# Altium PCB PCB_BrainBoard.PcbDoc (part 2 of 2)
Units mm, origin at the board's own origin, x right, y up, seen from the top; angles counter-clockwise.
Board outline 61.43 x 55.65 mm, 2 copper layers (Top Layer, Bottom Layer); 48 components, 39 nets, 219 pads, 49 vias.
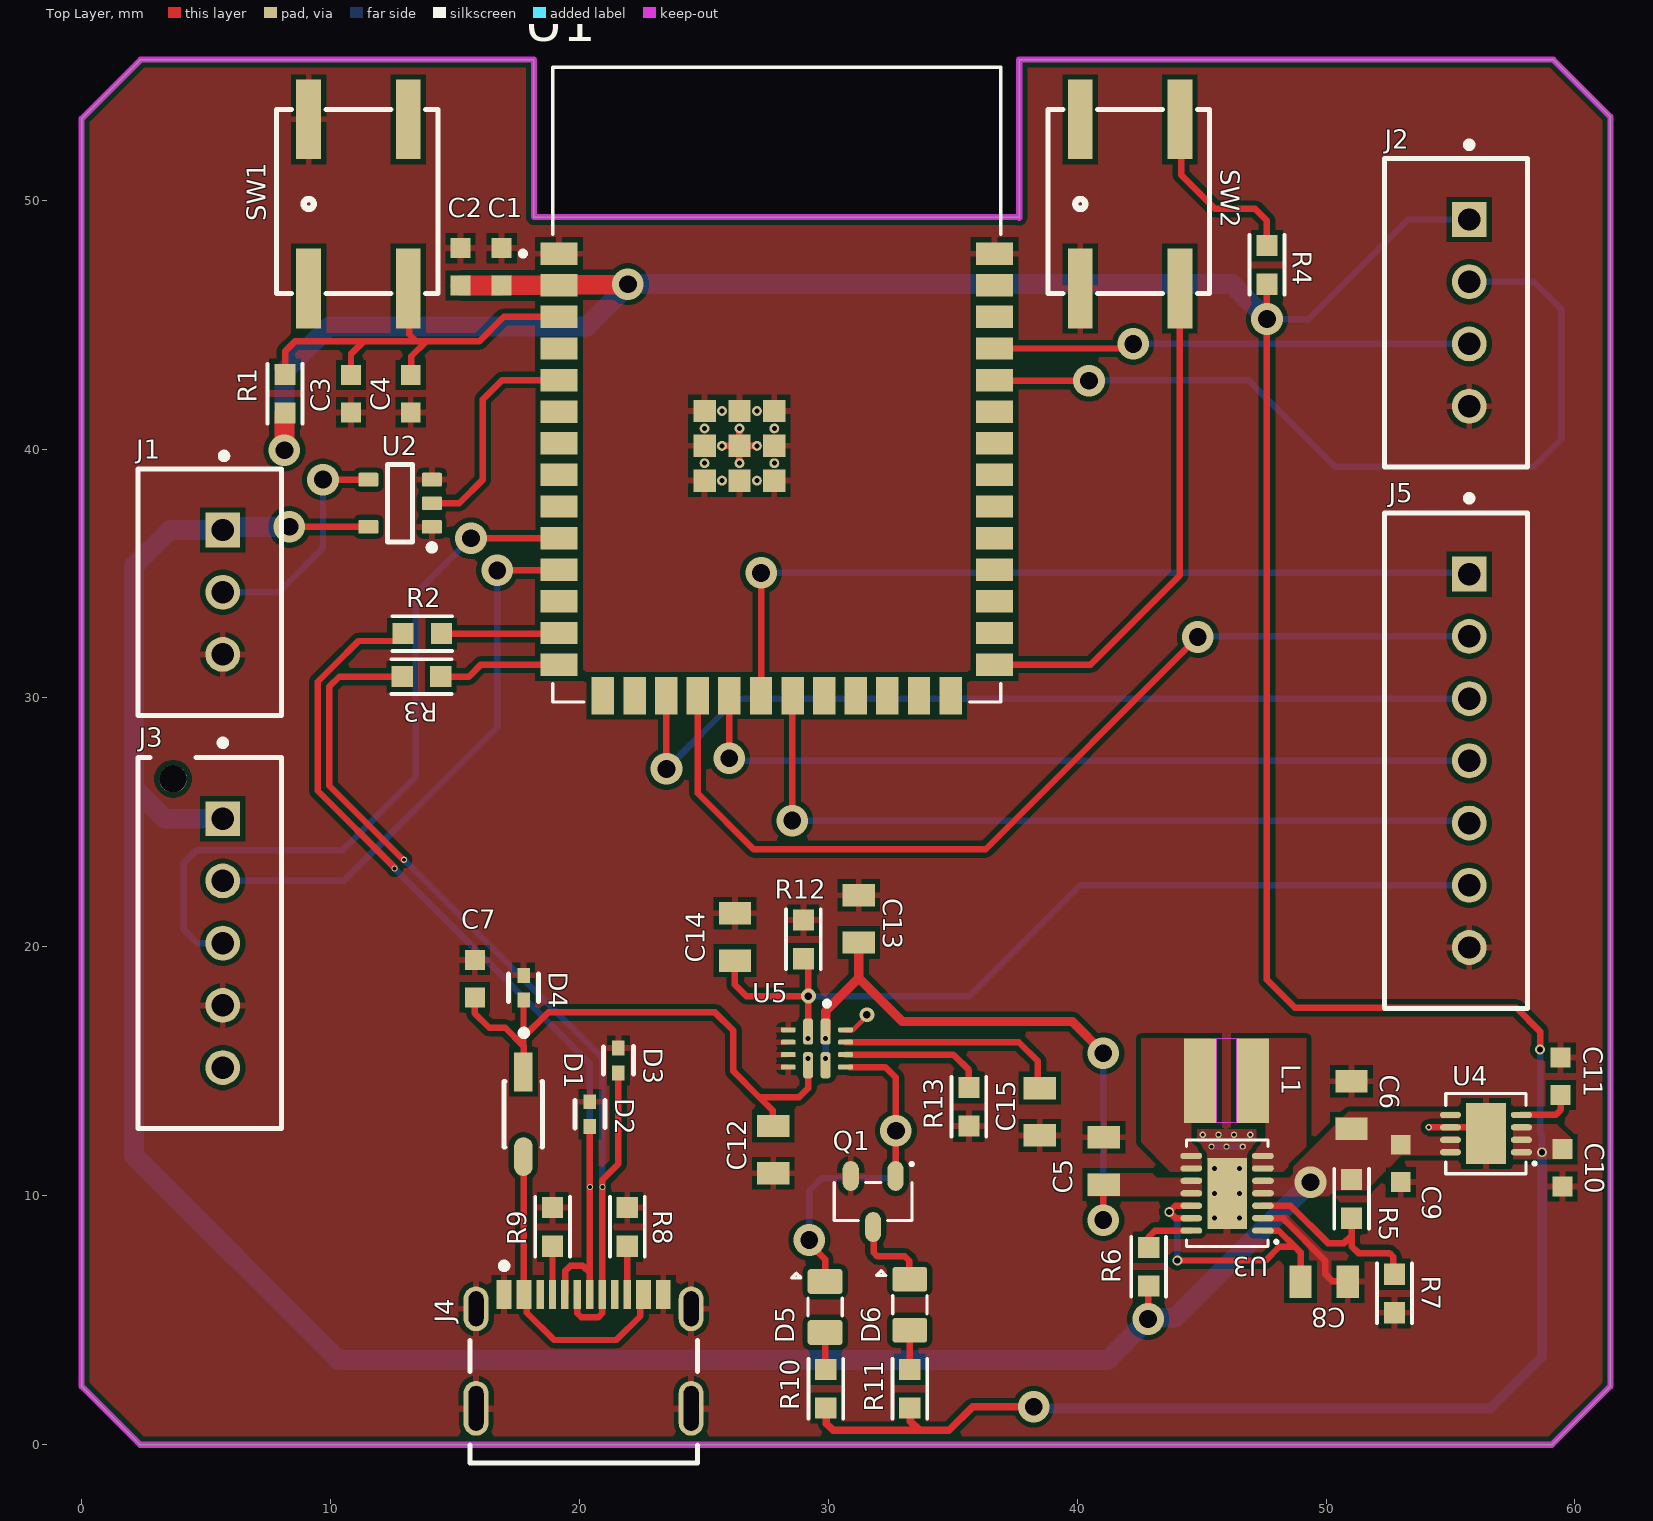
[diagram p0: Top Layer view]

## Part data (continued)
U4: "LDO Regulator Pos 3.3V 2A Medical 8-Pin LFCSP EP T/R", Dropout Voltage=172mV, Manufacturer="Analog Devices", Manufacturer Lifecycle Status=PRODUCTION, Max Junction Temperature (Tj)=125°C, Max Output current=2A, Max Supply Voltage=6.5V, Min Current Limit=2.4A, Min Input Voltage=2.3V, Min Operating Temperature=-40°C, Output Voltage=3.3V, Quiescent Current=700µA, Supplier Part Number=505-ADM7172ACPZ-3.3-R7CT-ND, Accuracy=1.5%, Category="Voltage Regulators - Linear", ComponentLink1Description=https://octopart.com:443/opatz8j6/c1?t=bexnlEUvTW4ypcfmMwlQqMukjbZ1sFR7u3HjvhF_p0I1qGgozQEmLYCO0KwwxyEbZiH-eJUsaq8roSbEQNHeTfmOLjlUalTxX2N5GzImcnPMgEcSznHyXIFAgYBb3OUFi_TCl-xASKxKL_mduVIwpazwMBHKV180gVIIaW80selJWFwC_3dSvsH907UDuDBRMF5w27S6ay03f3bc-2j1dmxAk8VGKHozbFK1-BDI5ZbzN8PLYE5HGUZO9k9f8snk51CSxxJCoL8hJ4y85Qa6ezUbzh37DwBqbNGjHclmawiQR9L4M29XjpI&src-supplier=Analog+Devices, ComponentLink1URL=https://octopart.com:443/opatz8j6/c1?t=bexnlEUvTW4ypcfmMwlQqMukjbZ1sFR7u3HjvhF_p0I1qGgozQEmLYCO0KwwxyEbZiH-eJUsaq8roSbEQNHeTfmOLjlUalTxX2N5GzImcnPMgEcSznHyXIFAgYBb3OUFi_TCl-xASKxKL_mduVIwpazwMBHKV180gVIIaW80selJWFwC_3dSvsH907UDuDBRMF5w27S6ay03f3bc-2j1dmxAk8VGKHozbFK1-BDI5ZbzN8PLYE5HGUZO9k9f8snk51CSxxJCoL8hJ4y85Qa6ezUbzh37DwBqbNGjHclmawiQR9L4M29XjpI&src-supplier=Analog+Devices, ComponentLink2Description=https://datasheet.octopart.com:443/ADM7172ACPZ-3.3-R7-Analog-Devices-datasheet-48279025.pdf?src-supplier=Analog+Devices, ComponentLink2URL=https://datasheet.octopart.com:443/ADM7172ACPZ-3.3-R7-Analog-Devices-datasheet-48279025.pdf?src-supplier=Analog+Devices, ComponentLink3Description=https://datasheet.octopart.com:443/ADM7172ACPZ-3.3-R7-Analog-Devices-datasheet-38520329.pdf?src-supplier=Analog+Devices, ComponentLink3URL=https://datasheet.octopart.com:443/ADM7172ACPZ-3.3-R7-Analog-Devices-datasheet-38520329.pdf?src-supplier=Analog+Devices, ComponentLink4Description=https://datasheet.octopart.com:443/ADM7172ACPZ-3.3-R7-Analog-Devices-datasheet-28823778.pdf?src-supplier=Analog+Devices, ComponentLink4URL=https://datasheet.octopart.com:443/ADM7172ACPZ-3.3-R7-Analog-Devices-datasheet-28823778.pdf?src-supplier=Analog+Devices, ComponentLink5Description=https://datasheet.octopart.com:443/ADM7172ACPZ-3.3-R7-Analog-Devices-datasheet-138896285.pdf?src-supplier=element14+APAC, ComponentLink5URL=https://datasheet.octopart.com:443/ADM7172ACPZ-3.3-R7-Analog-Devices-datasheet-138896285.pdf?src-supplier=element14+APAC, ComponentLink6Description=https://datasheet.octopart.com:443/ADM7172ACPZ-3.3-R7-Analog-Devices-datasheet-65849620.pdf?src-supplier=Farnell, ComponentLink6URL=https://datasheet.octopart.com:443/ADM7172ACPZ-3.3-R7-Analog-Devices-datasheet-65849620.pdf?src-supplier=Farnell, ComponentLink7Description=https://datasheet.octopart.com:443/ADM7172ACPZ-3.3-R7-Analog-Devices-datasheet-85391316.pdf?src-supplier=Augswan, ComponentLink7URL=https://datasheet.octopart.com:443/ADM7172ACPZ-3.3-R7-Analog-Devices-datasheet-85391316.pdf?src-supplier=Augswan, ComponentLink8Description=http://sigma.octopart.com:80/conflict_mineral_statement/Analog-Devices-company-33.pdf?src-supplier=Compliance+Statements, ComponentLink8URL=http://sigma.octopart.com:80/conflict_mineral_statement/Analog-Devices-company-33.pdf?src-supplier=Compliance+Statements, ComponentLink9Description=https://octopart.com:443/opatz8j6/c1?t=HP60T0laTHBr78PKNnBwM6RqgywCZdwDfs00A3_xvPXBlGZMB0MdxiYSNcNKfNWJXXZOlJEZQVeS8sOHWC_yzBqUXHUhuyAnEWhaxYA1OpH5fwwc5RqAQfGZuhPNXKQY3fp4_FYGdgOr9CJ69_o4g2M3JDXRpDLIoxiy_MvhA51uKxxlNiZkDQDLf5kNOadxR7lyBtK3STOEU-5RWzyenGvMvyyu3RhliVLg2Kl7XMJxgwTREY3xRC-2EhYST3IpebnuTZ5Sou7rm9ykF39dsCzAOMJd78Yclw1sa_MxoQ00ob-bF_4OtKU&src-supplier=Compliance+Statements, ComponentLink9URL=https://octopart.com:443/opatz8j6/c1?t=HP60T0laTHBr78PKNnBwM6RqgywCZdwDfs00A3_xvPXBlGZMB0MdxiYSNcNKfNWJXXZOlJEZQVeS8sOHWC_yzBqUXHUhuyAnEWhaxYA1OpH5fwwc5RqAQfGZuhPNXKQY3fp4_FYGdgOr9CJ69_o4g2M3JDXRpDLIoxiy_MvhA51uKxxlNiZkDQDLf5kNOadxR7lyBtK3STOEU-5RWzyenGvMvyyu3RhliVLg2Kl7XMJxgwTREY3xRC-2EhYST3IpebnuTZ5Sou7rm9ykF39dsCzAOMJd78Yclw1sa_MxoQ00ob-bF_4OtKU&src-supplier=Compliance+Statements, Height=800µm, Lead Free="Contains Lead", Lifecycle Status=Production, Manufacturer Part Number=ADM7172ACPZ-3.3-R7, Max Operating Temperature=125°C, Min Supply Voltage=2.3V, Mounting Technology="Surface Mount", Number of Outputs=1, Number of Regulators=1, Output Current=2A, Output Type=Fixed, Pins=8, Polarity=Positive, RoHS=Compliant, Schedule B="8542390000, 8542390000|8542390000|8542390000|8542390000|8542390000|8542390000|8542390000|8542390000|8542390000|8542390000|8542390000|8542390000|8542390000|8542390000|8542390000|8542390000|8542390000|8542390000|8542390000|8542390000|8542390000|8542390000|8542390000|85", Stock=650, Supplier=DigiKey
U5: "2.7-V to 22-V, 56-mΩ, 4.5-A, power mux with seamless switchover 12-VQFN-HR -40 to 125", Manufacturer="Texas Instruments", Manufacturer Lifecycle Status=ACTIVE, Max Junction Temperature (Tj)=125°C, Max Supply Voltage=22V, Min Operating Temperature=-40°C, Min Supply Voltage=2.8V, Nominal Supply Current=300µA, Supplier Part Number=296-53410-1-ND, Category="Power Management ICs", ComponentLink1Description=https://octopart.com:443/opatz8j6/c1?t=UKnKZsbDBKkWsuyviuPWhg6xnyY8YIPWRq3cGxhkt1CfXZne3rjgNtb9c8HEeUytPaPKf7af2uzAM0G6eOMOkh2IkH16zphJoSKUG-6Ea_yYAOQ3gP18ORaWd8ahF6Zf8RmVsrCt4o_VwsBjooNgHxpDYNmJeLQlCByhaq_oTqRGdi7WpnjOt0tXJGP0F5fO4d8rhyA_djt6xZO7O4pJMBUW0eJFZLB1i-juaiql1BsYqxGr4NgutUQ6UwkoV3Xj_pIx-QhqZmSQhVum4Bj9ANjIamkSlAEGTqhin75-oCdQByKwn2rfzrP7MxY01-ZaYe5651WmC_B7txcOTqRcf7lt80iDfsYBE-b8NP8aazKY0bGgVcCP00e8bu-KKwkHkhoMuZ4&src-supplier=Texas+Instruments, ComponentLink1URL=https://octopart.com:443/opatz8j6/c1?t=UKnKZsbDBKkWsuyviuPWhg6xnyY8YIPWRq3cGxhkt1CfXZne3rjgNtb9c8HEeUytPaPKf7af2uzAM0G6eOMOkh2IkH16zphJoSKUG-6Ea_yYAOQ3gP18ORaWd8ahF6Zf8RmVsrCt4o_VwsBjooNgHxpDYNmJeLQlCByhaq_oTqRGdi7WpnjOt0tXJGP0F5fO4d8rhyA_djt6xZO7O4pJMBUW0eJFZLB1i-juaiql1BsYqxGr4NgutUQ6UwkoV3Xj_pIx-QhqZmSQhVum4Bj9ANjIamkSlAEGTqhin75-oCdQByKwn2rfzrP7MxY01-ZaYe5651WmC_B7txcOTqRcf7lt80iDfsYBE-b8NP8aazKY0bGgVcCP00e8bu-KKwkHkhoMuZ4&src-supplier=Texas+Instruments, ComponentLink2Description=http://sigma.octopart.com:80/reach_statement/Texas-Instruments-company-64.pdf?src-supplier=Compliance+Statements, ComponentLink2URL=http://sigma.octopart.com:80/reach_statement/Texas-Instruments-company-64.pdf?src-supplier=Compliance+Statements, ComponentLink3Description=http://sigma.octopart.com:80/conflict_mineral_statement/Texas-Instruments-company-63.pdf?src-supplier=Compliance+Statements, ComponentLink3URL=http://sigma.octopart.com:80/conflict_mineral_statement/Texas-Instruments-company-63.pdf?src-supplier=Compliance+Statements, Height=1mm, Length=2.5mm, Lifecycle Status=Production, Manufacturer Part Number=TPS2121RUXR, Max Operating Temperature=125°C, Number of Outputs=1, Output Voltage=22V, Pins=12, RoHS=Compliant, Schedule B="8542390000, 8542390000|8542390000|8542390000|8542390000|8542390000", Stock=13790, Supplier=DigiKey, Thickness=900µm, Width=2mm

## Via types
v1: diameter 1.27, hole 0.711, Top Layer to Bottom Layer, 21 vias
v2: diameter 0.25, hole 0.15, Top Layer to Bottom Layer, 12 vias
v3: diameter 0.5, hole 0.2, Top Layer to Bottom Layer, 6 vias
v4: diameter 0.4, hole 0.25, Top Layer to Bottom Layer, 4 vias
v5: diameter 0.3, hole 0.2, Top Layer to Bottom Layer, 4 vias
v6: diameter 0.6, hole 0.3, Top Layer to Bottom Layer, 2 vias

## Nets (pads, with @x,y where several pads share a name; then routed paths per layer and width w, separated by ;. In a path a pad name is that pad's centre, name@x,y a point inside that pad or via, vN(x,y) a via of type N, cw(c..) or ccw(c..) an arc to the next point about the centre after c; other vN are vias at no path point)
+5: C6.2 C9.2 J1.1 J3.1 R5.2 R6.2 U2.5 U3.4 U3.5 U4.5 U4.7 U4.8 | length 92.8
  Top Layer w0.26: v1(8.35,36.875) U2.5 ; v1(42.85,5.05) 42.85,6.35 R6.2 ; v1(49.376,10.549) v1@49.386,10.549
  Bottom Layer w0.8: J3.1 3.35,25.15 2.1,26.4 ; v1(8.35,36.875) 5.8,36.875 J1.1 3.55,36.75 2.1,35.3 2.1,26.4 ; v1(49.376,10.549) 43.928,5.1 42.9,5.1 v1(42.85,5.05) 42.85,5.025 41.225,3.4 10.325,3.4 2.1,11.625 2.1,26.4
"+5 VBUS": C7.2 C12.1 D1.1 D4.2 U5.7 | length 22.8
  Top Layer w0.254: 17.757,16.018 17.757,16.379 D4.2
  Top Layer w0.26: C7.2 15.8,17.325 16.375,16.75 17.025,16.75 17.757,16.018 D1.1@17.757,14.901 ; 17.757,16.379 18.745,17.367 25.453,17.367 26.19,16.631 26.19,15.005 27.231,13.964 ; C12.1 27.765,12.831 27.765,13.43 27.231,13.964 ; U5.7 29.193,14.33 28.827,13.964 27.231,13.964
  other v5: 29.193,15.52
CON_USB_N: D3.2 J4.A6 J4.B6 R3.1 | length 39.6
  Top Layer w0.26: R3.1 10.35,30.857 9.95,30.458 9.95,26.47 12.92,23.5 v2(12.95,23.5) ; J4.A6 19.92,5.277 20.072,5.125 20.768,5.125 20.92,5.277 J4.B6 20.92,10.63 21.567,11.277 D3.2
  Bottom Layer w0.26: v2(12.95,23.5) 20.925,15.525 v2(20.925,10.35)
CON_USB_P: D2.2 J4.A7 J4.B7 R2.1 | length 37.9
  Top Layer w0.26: v2(12.575,23.15) 12.575,23.19 9.487,26.278 9.487,30.649 10.13,31.292 11.127,32.289 12.613,32.289 R2.1 ; J4.B7 19.44,6.055 19.44,6.985 19.637,7.182 20.145,7.182 20.424,6.903 ; J4.A7@20.424,6.039 20.424,6.903 ; D2.2 20.424,10.351 v2(20.425,10.35) v2(20.425,10.35) 20.424,6.903
  Bottom Layer w0.26: v2(12.575,23.15) 20.425,15.3 v2(20.425,10.35)
EN: C3.2 C4.2 R1.1 SW1.4 U1.3 | length 17.9
  Top Layer w0.26: R1.1 8.175,43.925 8.575,44.325 11.325,44.325 ; C3.2 10.825,43.825 11.325,44.325 ; SW1.4 13.163,46.412 13.163,44.612 13.45,44.325 ; C4.2 13.25,43 13.25,43.725 13.85,44.325 ; U1.3 16.962,45.312 15.975,44.325 13.85,44.325 ; 11.325,44.325 13.45,44.325 ; 13.45,44.325 13.85,44.325
GND: C1.1 C2.2 C3.1 C4.1 C5.1 C6.1 C7.1 C8.1 C9.1 C10.1 C11.1 C12.2 C13.1 C14.1 C15.1 D2.1 D3.1 D4.1 J1.3 J2.4 J3.4 J4.1 J4.2 J4.3 J4.4 J4.A1-B12 J4.B1-A12 J5.7 Q1.2 R7.1 R8.1 R9.1 R12.1 R13.1 SW1.2 SW2.3 U1.1 U1.40 U1.41_1 U1.41_2 U1.41_3 U1.41_4 U1.41_5 U1.41_6 U1.41_7 U1.41_8 U1.41_9 U1.41_10 U1.41_11 U1.41_12 U1.41_13 U1.41_14 U1.41_15 U1.41_16 U1.41_17 U1.41_18 U1.41_19 U1.41_20 U1.41_21 U2.1 U2.3 U3.2 U3.15 U4.6 U4.9 U5.3 U5.4 U5.5 U5.6 U5.12 | length 12.4
  Top Layer w0.2: U5.12 31,16.67 31.55,17.22 v6(31.55,17.275)
  Top Layer w0.26: U1.41_18 U1.41_1 ; U1.41_14 U1.41_1 ; U1.41_10 U1.41_1 ; U1.41_19 U1.41_1 ; U3.2 47.467,9.095 48.255,9.095 49.975,7.375 49.975,6.85 50.25,6.575 50.85,6.575 C8.1 ; v2(54.125,12.75) 56.175,12.75 U4.9
  Bottom Layer w0.26: v2(45.4,11.975) v2(46,11.975) v2(46.65,11.975)
  other v2: 45.05,12.45 45.675,12.45 46.3,12.45 46.95,12.45
  other v3: 45.525,9.1 46.525,9.1 45.525,10.1 46.525,10.1 45.525,11.1 46.525,11.1
GPIO0: SW2.4 U1.27 | length 20.5
  Top Layer w0.26: U1.27 40.542,31.342 44.125,34.925 SW2.4
LED_DATA_3V3: U1.5 U2.2 | length 9
  Top Layer w0.26: U2.2 15.175,37.825 16.125,38.775 16.125,42 16.897,42.772 U1.5
LED_DATA_5V: J1.2 U2.4 | length 9.3
  Top Layer w0.26: v1(9.7,38.775) U2.4
  Bottom Layer w0.26: J1.2 7.925,34.25 9.7,36.025 v1(9.7,38.775)
MUX_P: D5.2 Q1.1 U5.9 | length 15.4
  Top Layer w0.26: v1(29.238,8.223) 29.238,8.081 29.873,7.446 D5.2 ; U5.9@30.863,15.159 32.299,15.159 32.718,14.741 v1(32.718,12.618) 32.71,12.61 32.71,10.805 Q1.1
  Bottom Layer w0.26: v1(29.238,8.223) 29.238,10.205 29.746,10.713 32.565,10.713 32.718,10.865 v1(32.718,12.618)
NetC8_2: C8.2 U3.1 U3.12 U3.13 | length 12.1
  Top Layer w0.26: v4(44.025,7.4) 47.575,7.4 48.125,7.95 48.75,7.95 ; U3.13 44.582,9.105 43.958,9.105 43.713,9.35 v4(43.7,9.35) 43.945,9.595 44.582,9.595 U3.12 ; U3.1 47.467,8.595 48.104,8.595 48.75,7.95 ; C8.2 48.975,7.724 48.75,7.95
  Bottom Layer w0.26: v4(43.7,9.35) 43.7,9.312 44.025,8.987 v4(44.025,7.4)
NetC11_2: C11.2 U4.4 | length 2.3
  Top Layer w0.26: U4.4 59.225,13.25 59.425,13.45 59.425,13.95 59.375,14 C11.2
NetC15_2: C15.2 U5.11 | length 9.2
  Top Layer w0.26: U5.11 37.655,16.17 38.425,15.4 38.425,14.4 C15.2
NetD1_2: D1.2 J4.A4-B9 J4.B4-A9 | length 12.6
  Top Layer w0.254: D1.2@17.757,11.5 17.764,11.493 17.764,6.041 J4.A4-B9 17.889,5.916 17.889,5.302 18.987,4.204 21.489,4.204 22.451,5.167 22.451,5.916 J4.B4-A9
NetD5_1: D5.1 R10.1 | length 1.5
  Top Layer w0.26: D5.1 29.873,3.052 R10.1
NetD6_1: D6.1 R11.1 | length 1.6
  Top Layer w0.26: R11.1 33.276,3.026 D6.1
NetD6_2: D6.2 Q1.3 | length 3.3
  Top Layer w0.26: Q1.3 31.829,8.722 31.829,7.715 31.981,7.563 33.073,7.563 33.25,7.386 33.25,6.675 D6.2
NetJ4_A5: J4.A5 R9.2 | length 1.9
  Top Layer w0.26: J4.A5 18.92,7.97 R9.2
NetJ4_B5: J4.B5 R8.2 | length 1.9
  Top Layer w0.26: J4.B5 21.92,7.97 R8.2
NetL1_1: L1.1 U3.8 U3.9
NetL1_2: L1.2 U3.6 U3.7
NetR2_2: R2.2 U1.13 | length 4.7
  Top Layer w0.26: R2.2 19.154,32.584 U1.13
NetR3_2: R3.2 U1.14 | length 5
  Top Layer w0.26: R3.2 15.562,30.857 16.047,31.342 U1.14
NetR4_1: R4.1 SW2.1 | length 7.5
  Top Layer w0.26: SW2.1 44.175,53.2 44.175,51.025 45.55,49.65 47.15,49.65 47.625,49.175 R4.1
NetR5_1: R5.1 R7.2 U3.3 | length 8
  Top Layer w0.26: U3.3 48.575,9.6 50.075,8.1 50.725,8.1 51.025,8.4 ; R5.1 51.025,8.4 ; R7.2 52.7,6.9 52.7,7.548 52.548,7.7 51.3,7.7 51.025,7.975 51.025,8.4
NetR6_1: R6.1 U3.14 | length 2.2
  Top Layer w0.26: R6.1 42.875,8.35 43.125,8.6 U3.14
NetR13_2: R13.2 U5.10 | length 5.9
  Top Layer w0.26: U5.10 35.03,15.67 35.65,15.05 R13.2
RX_LIDAR: J3.3 U1.10 | length 29.3
  Top Layer w0.26: v1(15.647,36.422) U1.10
  Bottom Layer w0.26: J3.3 4.65,20.15 4.1,20.7 4.1,23.375 4.6,23.875 10.475,23.875 13.425,26.825 13.425,34.2 v1(15.647,36.422)
RXD0: J2.2 U1.36 | length 34.1
  Top Layer w0.26: U1.36 36.704,42.75 v1(40.475,42.75)
  Bottom Layer w0.26: v1(40.475,42.75) 40.5,42.775 46.875,42.775 50.35,39.3 58.35,39.3 59.45,40.4 59.45,45.625 58.35,46.725 J2.2@55.725,46.725
SPI_CB_CLK: J5.1 U1.20 | length 33.4
  Top Layer w0.26: U1.20 27.3,30.095 v1(27.3,35.025)
  Bottom Layer w0.26: v1(27.3,35.025) 55.7,35.025 J5.1
SPI_CB_CS: J5.2 U1.18 | length 39.4
  Top Layer w0.26: U1.18 24.757,26.168 27,23.925 36.325,23.925 v1(44.85,32.45)
  Bottom Layer w0.26: v1(44.85,32.45) 44.875,32.475 J5.2
SPI_CB_Handshake: J5.3 U1.17 | length 36.4
  Top Layer w0.26: U1.17 23.5,30.079 v1(23.5,27.15)
  Bottom Layer w0.26: v1(23.5,27.15) 26.325,29.975 J5.3
SPI_CB_MISO: J5.4 U1.19 | length 32.3
  Top Layer w0.26: v1(26.025,27.575) 26.025,30.09 U1.19
  Bottom Layer w0.26: v1(26.025,27.575) 26.125,27.475 J5.4
SPI_CB_MOSI: J5.5 U1.21 | length 32.3
  Top Layer w0.26: v1(28.55,25.075) 28.55,30.075 U1.21
  Bottom Layer w0.26: v1(28.55,25.075) 55.65,25.075 J5.5
TX_LIDAR: J3.2 U1.11 | length 22.4
  Top Layer w0.26: v1(16.7,35.125) 19.155,35.125 U1.11
  Bottom Layer w0.26: J3.2 10.525,22.65 16.7,28.825 v1(16.7,35.125)
TXD0: J2.3 U1.37 | length 19.1
  Top Layer w0.26: U1.37 42.067,44.042 v1(42.25,44.225)
  Bottom Layer w0.26: v1(42.25,44.225) J2.3@55.725,44.225
Vbat: C14.2 J5.6 R12.2 U5.2 | length 35.5
  Top Layer w0.26: C14.2 26.25,18.475 26.7,18.025 v6(29.2,18.025) ; R12.2 29.2,19.325 v6(29.2,18.025) ; U5.2 29.196,16.598 29.196,18.021 v6(29.2,18.025)
  Bottom Layer w0.26: v6(29.2,18.025) 35.672,18.025 40.122,22.475 J5.6@55.767,22.475
  other v5: 29.193,16.32
VDD33: C1.2 C2.1 C10.2 J2.1 R1.2 R4.2 R10.2 R11.2 U1.2 U4.1 U4.2 U4.3 | length 147.5
  Top Layer w0.26: R1.2@8.15,41.425 R1.2 ; C1.2 C1.2@16.882,46.582 ; R4.2 v1(47.625,45.225) 47.625,18.675 48.75,17.55 57.65,17.55 58.6,16.6 v4(58.6,15.875)
  Top Layer w0.3: R10.2 29.95,1.425 29.875,1.35 29.925,1.3 29.925,0.85 30.2,0.575 33.675,0.575 ; R11.2 33.3,1.45 33.3,0.95 33.675,0.575 ; v1(38.25,1.525) 35.8,1.525 34.85,0.575 33.675,0.575
  Top Layer w0.8: v1(8.15,39.95) R1.2@8.15,41.425 ; C2.1 C1.2 ; C1.2@16.882,46.582 U1.2 19.203,46.603 21.928,46.603 v1(21.95,46.625)
  Bottom Layer w0.26: v1(47.625,45.225) 49.3,45.225 53.3,49.225 J2.1@55.725,49.225 ; v4(58.6,15.875) 58.612,15.863 58.612,12.47 58.675,12.408 v4(58.675,11.75)
  Bottom Layer w0.4: v1(38.25,1.525) 38.325,1.45 56.6,1.45 58.675,3.525 v4(58.675,11.75)
  Bottom Layer w0.8: v1(8.15,39.95) 8.15,43.125 9.95,44.925 20.3,44.925 21.95,46.575 v1(21.95,46.625) 46.225,46.625 v1(47.625,45.225)
Vsys: C5.2 C13.2 U3.10 U3.11 U5.1 U5.8 | length 24.2
  Top Layer w0.26: v1(41.05,9.025) 41.05,10.425 C5.2
  Top Layer w0.375: U5.1 29.893,17.418 31.225,18.75 ; C13.2 31.225,18.75 ; v1(41.05,15.725) 41.05,15.75 39.8,17 32.975,17 31.225,18.75
  Bottom Layer w0.26: v5(29.893,15.52) v5(29.893,16.32) ; v1(41.05,9.025) v1(41.05,15.725)
pads on no net: J3. J3.5 J4.A8 J4.B8 SW1.1 SW1.3 SW2.2 U1.4 U1.6 U1.7 U1.8 U1.9 U1.12 U1.15 U1.16 U1.22 U1.23 U1.24 U1.25 U1.26 U1.28 U1.29 U1.30 U1.31 U1.32 U1.33 U1.34 U1.35 U1.38 U1.39

## Polygon pours and split planes (outlines as drawn)
GND on Top Layer "GND_L01_P023" (solid, pour order 23): 18.287,55.562 18.287,49.237 37.788,49.237 37.788,55.562 59.238,55.562 61.537,53.263 61.537,2.262 59.188,-0.087 59.188,-0.088 2.462,-0.088 0.113,2.262 0.113,53.188 2.488,55.562 0.113,53.188 2.488,55.562
VDD33 on Top Layer "VDD33_L01_P017" (solid, pour order 17): 59.825,11.475 57.525,11.475 57.525,12.875 59.275,12.875 59.825,12.325
GND on Top Layer "GND_L01_P016" (solid, pour order 16): 46.688,11.3 47.015,11.925 47.075,12.05 47.2,12.175 47.2,12.675 44.825,12.675 44.825,12.2 44.975,12.1 45.289,11.3
+5 on Top Layer "+5_L01_P020" (solid, pour order 20): 55.325,13.375 55.325,13.125 54.15,13.125 53.875,12.85 53.875,12.6 54.1,12.375 55.325,12.375 55.325,11.625 53.025,11.625 51.625,10.225 48.675,10.225 48.675,11.163 50.887,13.375
Vsys on Top Layer "VSYS_L01_P018" (solid, pour order 18): 40.45,9.975 40.45,10.9 43.025,10.9 43.2,10.725 45,10.725 45,9.975
NetL1_1 on Top Layer "NETL1_1_L01_P022" (solid, pour order 22): 45.001,10.975 43.75,10.975 42.575,12.15 42.575,16.325 45.375,16.325 45.375,13.7 44.575,13.7 44.575,12.175 44.975,11.775
NetL1_2 on Top Layer "NETL1_2_L01_P021" (solid, pour order 21): 47.025,10.975 47.025,11.775 47.575,12.325 47.575,13.7 46.4,13.7 46.4,16.325 49.2,16.325 49.2,11.9 48.275,10.975
+5 on Top Layer "+5_L01_P019" (solid, pour order 19): 51.675,13.15 50.375,13.15 50.375,12.575 48.525,10.725 47.05,10.725 47.05,10.025 47.1,9.975 50.1,9.975 50.35,10.225 51.675,10.225
GND on Bottom Layer "GND_L02_P024" (solid, pour order 24): 18.175,55.65 18.175,49.325 37.675,49.325 37.675,55.65 59.125,55.65 61.425,53.35 61.425,2.35 59.075,0 2.35,0 0,2.35 0,53.275 2.375,55.65 0,53.275 2.375,55.65

## Keep-outs
Keep-Out Layer:
  the board outline again, w0.254

## Text inside footprints (layer, text, board x,y; h text height)
U1: Top 3D Body "ANTENNA" at 23.432,52.092 h1.27